# Altium PCB BOARD_4LAYER.PcbDoc (part 7 of 21)
Units mil, origin at the board's own origin, x right, y up, seen from the top; angles counter-clockwise.
Board outline 6692.91 x 10039.37 mil, 4 copper layers (Top Layer, Mid Layer 1, Mid Layer 2, Bottom Layer), stack 66.299 mil thick; 1532 components, 908 nets, 4105 pads, 1286 vias.
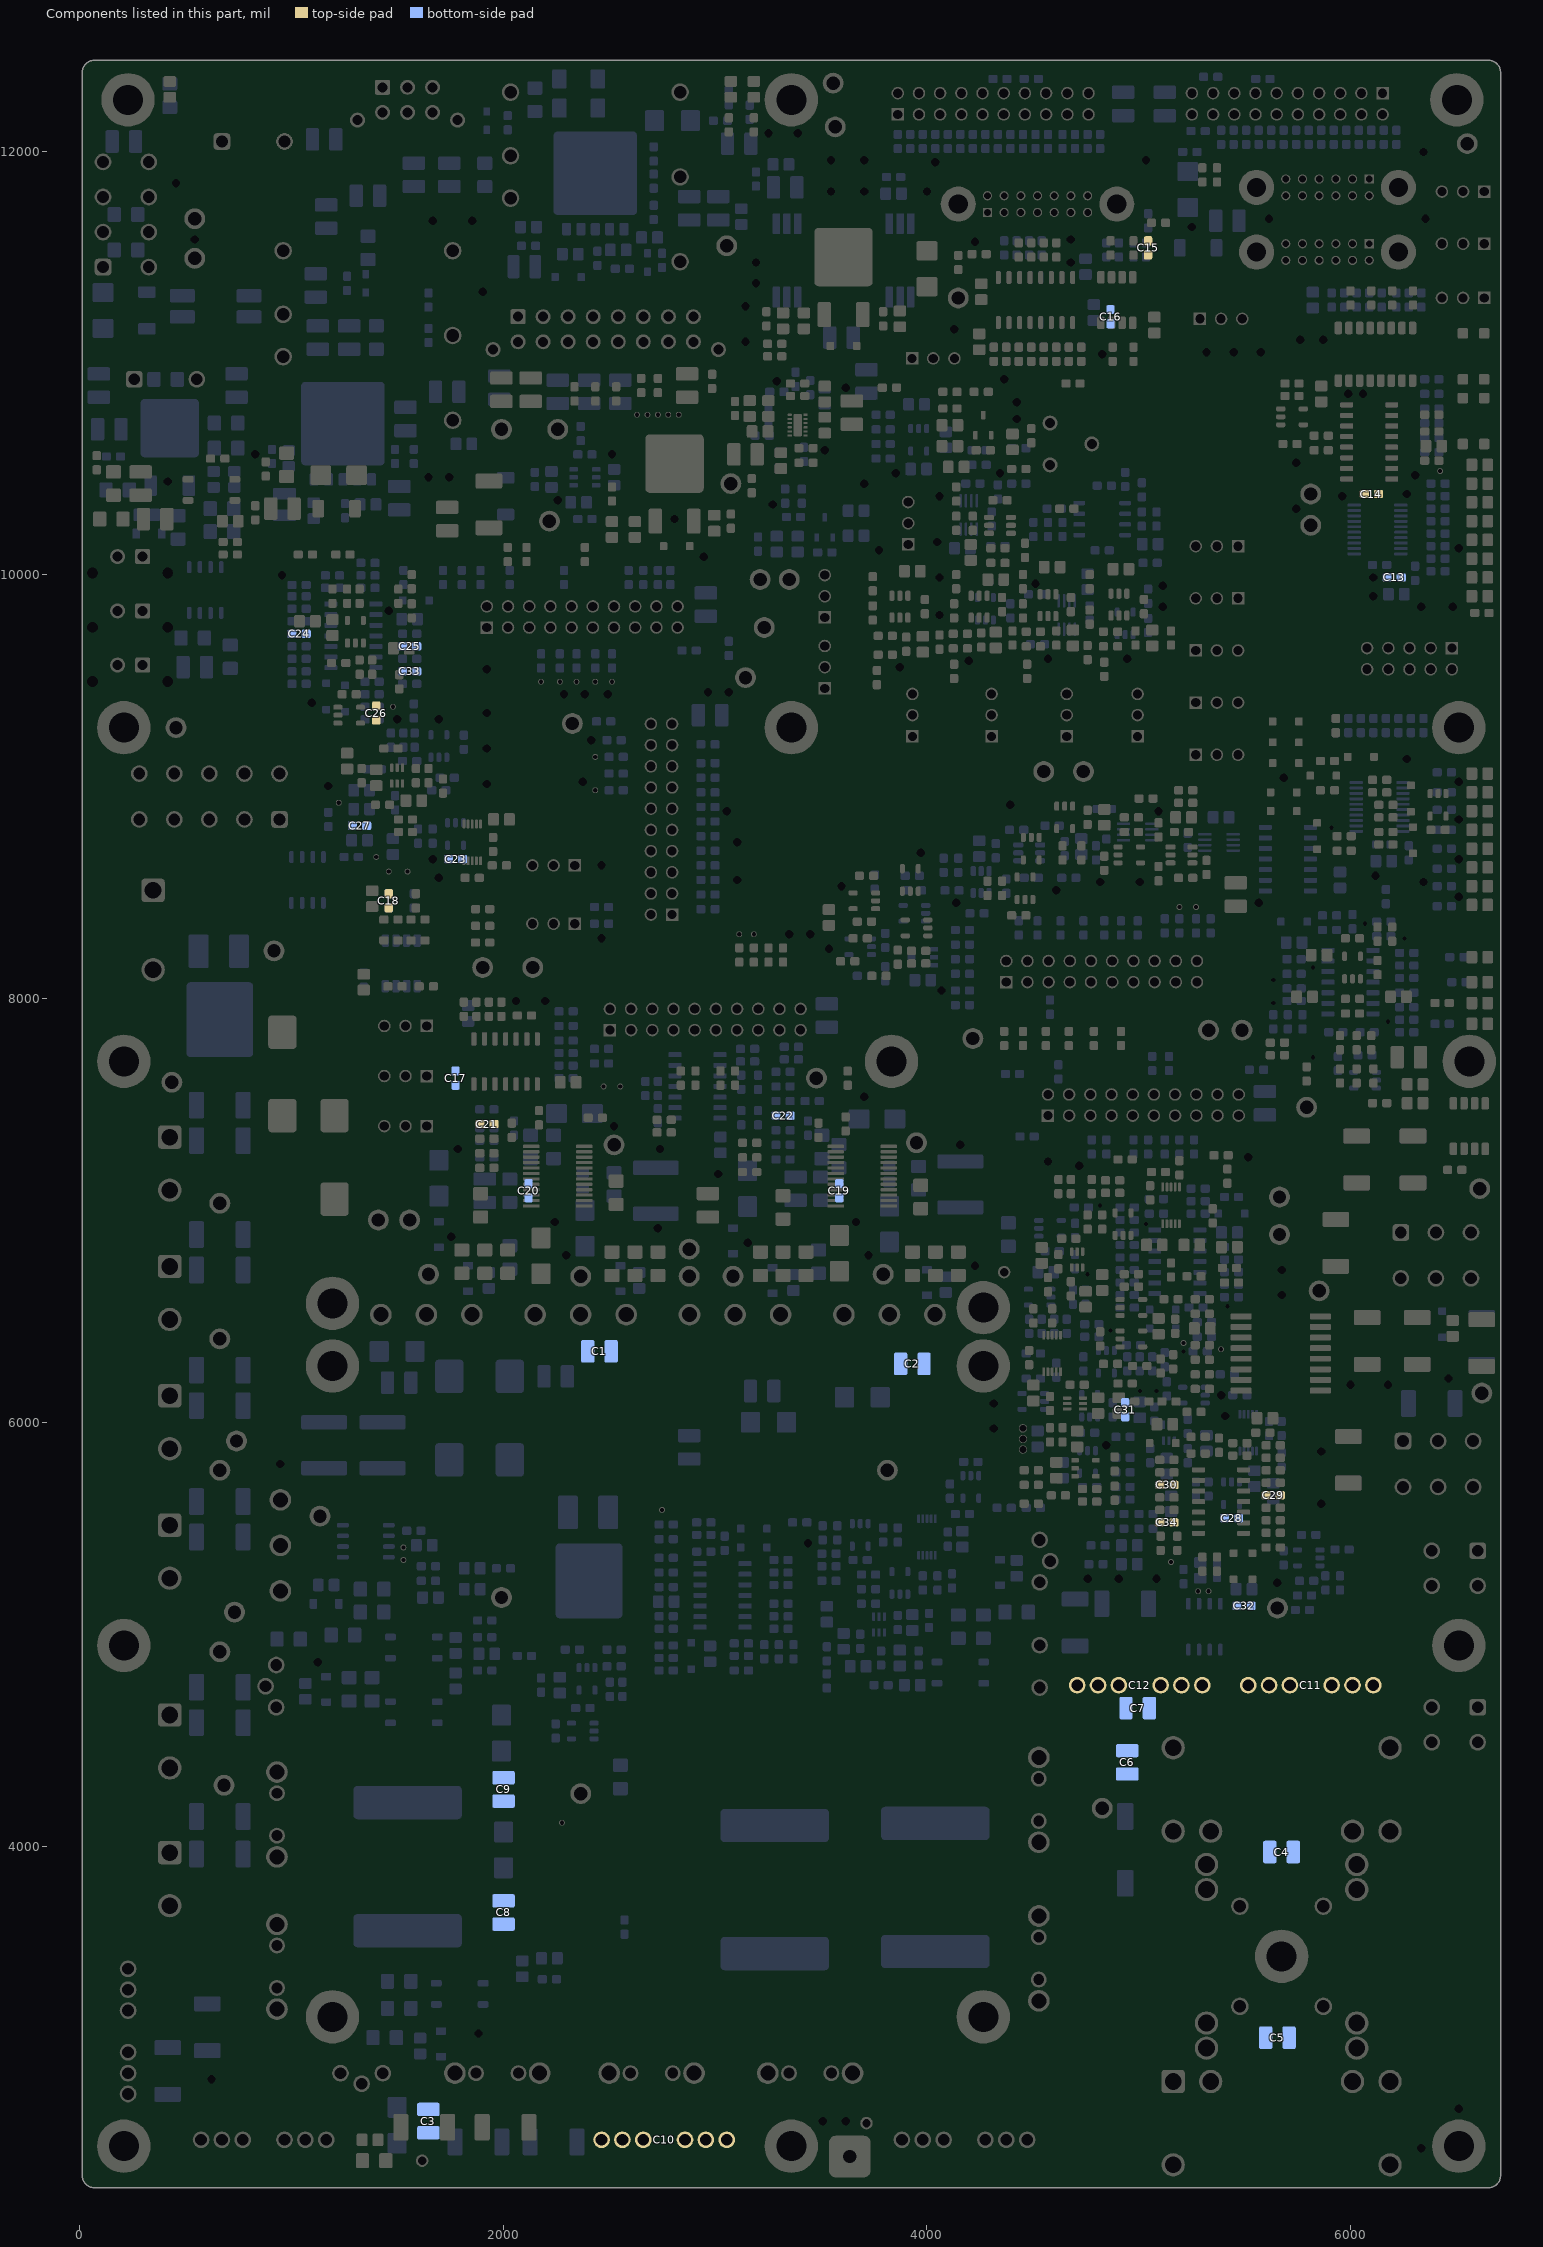
[diagram p9: the components of this part, seen from the top]

## Design rules (kind name [scope] priority, off if disabled: settings) (continued)
PolygonConnect PolygonConnect_In_GND_L01_P431 [IsNamedPolygon('GND_L01_P431')] p582: thpad.connectstyle=Relief thpad.reliefconductorwidth=19.68 thpad.reliefentries=4 thpad.polygonreliefangle="90 Angle" thpad.airgapwidth=9.84 smdpad.connectstyle=Relief smdpad.reliefconductorwidth=19.68 smdpad.reliefentries=4 smdpad.polygonreliefangle="90 Angle" smdpad.airgapwidth=9.84 via.connectstyle=Direct via.reliefconductorwidth=5.12 via.reliefentries=2 via.polygonreliefangle="90 Angle" via.airgapwidth=0
PolygonConnect PolygonConnect_In_GND_L01_P423 [IsNamedPolygon('GND_L01_P423')] p583: thpad.connectstyle=Relief thpad.reliefconductorwidth=19.68 thpad.reliefentries=4 thpad.polygonreliefangle="90 Angle" thpad.airgapwidth=9.84 smdpad.connectstyle=Relief smdpad.reliefconductorwidth=19.68 smdpad.reliefentries=4 smdpad.polygonreliefangle="90 Angle" smdpad.airgapwidth=9.84 via.connectstyle=Direct via.reliefconductorwidth=5.12 via.reliefentries=2 via.polygonreliefangle="90 Angle" via.airgapwidth=0
PolygonConnect PolygonConnect_In_U_TS_L-01_P155 [IsNamedPolygon('U_TS_L-01_P155')] p584: thpad.connectstyle=Relief thpad.reliefconductorwidth=19.68 thpad.reliefentries=4 thpad.polygonreliefangle="90 Angle" thpad.airgapwidth=9.84 smdpad.connectstyle=Relief smdpad.reliefconductorwidth=19.68 smdpad.reliefentries=4 smdpad.polygonreliefangle="90 Angle" smdpad.airgapwidth=9.84 via.connectstyle=Direct via.reliefconductorwidth=5.12 via.reliefentries=2 via.polygonreliefangle="90 Angle" via.airgapwidth=0
PolygonConnect PolygonConnect_In_+U_VENT_L02_P503 [IsNamedPolygon('+U_VENT_L02_P503')] p585: thpad.connectstyle=Relief thpad.reliefconductorwidth=19.68 thpad.reliefentries=4 thpad.polygonreliefangle="90 Angle" thpad.airgapwidth=9.84 smdpad.connectstyle=Relief smdpad.reliefconductorwidth=19.68 smdpad.reliefentries=4 smdpad.polygonreliefangle="90 Angle" smdpad.airgapwidth=9.84 via.connectstyle=Direct via.reliefconductorwidth=5.12 via.reliefentries=2 via.polygonreliefangle="90 Angle" via.airgapwidth=0
PolygonConnect PolygonConnect_In_$6N135_L-01_P085 [IsNamedPolygon('$6N135_L-01_P085')] p586: thpad.connectstyle=Relief thpad.reliefconductorwidth=19.68 thpad.reliefentries=4 thpad.polygonreliefangle="90 Angle" thpad.airgapwidth=9.84 smdpad.connectstyle=Relief smdpad.reliefconductorwidth=19.68 smdpad.reliefentries=4 smdpad.polygonreliefangle="90 Angle" smdpad.airgapwidth=9.84 via.connectstyle=Direct via.reliefconductorwidth=5.12 via.reliefentries=2 via.polygonreliefangle="90 Angle" via.airgapwidth=0
PolygonConnect PolygonConnect_In_GND_UM_L02_P619 [IsNamedPolygon('GND_UM_L02_P619')] p587: thpad.connectstyle=Relief thpad.reliefconductorwidth=19.68 thpad.reliefentries=4 thpad.polygonreliefangle="90 Angle" thpad.airgapwidth=9.84 smdpad.connectstyle=Relief smdpad.reliefconductorwidth=19.68 smdpad.reliefentries=4 smdpad.polygonreliefangle="90 Angle" smdpad.airgapwidth=9.84 via.connectstyle=Direct via.reliefconductorwidth=5.12 via.reliefentries=2 via.polygonreliefangle="90 Angle" via.airgapwidth=0
PolygonConnect PolygonConnect_In_$4N4016_L02_P538 [IsNamedPolygon('$4N4016_L02_P538')] p588: thpad.connectstyle=Relief thpad.reliefconductorwidth=19.68 thpad.reliefentries=4 thpad.polygonreliefangle="90 Angle" thpad.airgapwidth=9.84 smdpad.connectstyle=Relief smdpad.reliefconductorwidth=19.68 smdpad.reliefentries=4 smdpad.polygonreliefangle="90 Angle" smdpad.airgapwidth=9.84 via.connectstyle=Direct via.reliefconductorwidth=5.12 via.reliefentries=2 via.polygonreliefangle="90 Angle" via.airgapwidth=0
PolygonConnect PolygonConnect_In_$2N2408_L-01_P170 [IsNamedPolygon('$2N2408_L-01_P170')] p589: thpad.connectstyle=Relief thpad.reliefconductorwidth=19.68 thpad.reliefentries=4 thpad.polygonreliefangle="90 Angle" thpad.airgapwidth=9.84 smdpad.connectstyle=Relief smdpad.reliefconductorwidth=19.68 smdpad.reliefentries=4 smdpad.polygonreliefangle="90 Angle" smdpad.airgapwidth=9.84 via.connectstyle=Direct via.reliefconductorwidth=5.12 via.reliefentries=2 via.polygonreliefangle="90 Angle" via.airgapwidth=0
PolygonConnect PolygonConnect_In_GND_L02_P409 [IsNamedPolygon('GND_L02_P409')] p590: thpad.connectstyle=Relief thpad.reliefconductorwidth=19.68 thpad.reliefentries=4 thpad.polygonreliefangle="90 Angle" thpad.airgapwidth=9.84 smdpad.connectstyle=Relief smdpad.reliefconductorwidth=19.68 smdpad.reliefentries=4 smdpad.polygonreliefangle="90 Angle" smdpad.airgapwidth=9.84 via.connectstyle=Direct via.reliefconductorwidth=5.12 via.reliefentries=2 via.polygonreliefangle="90 Angle" via.airgapwidth=0
PolygonConnect PolygonConnect_In_PGND_L02_P238 [IsNamedPolygon('PGND_L02_P238')] p591: thpad.connectstyle=Relief thpad.reliefconductorwidth=19.68 thpad.reliefentries=4 thpad.polygonreliefangle="90 Angle" thpad.airgapwidth=9.84 smdpad.connectstyle=Relief smdpad.reliefconductorwidth=19.68 smdpad.reliefentries=4 smdpad.polygonreliefangle="90 Angle" smdpad.airgapwidth=9.84 via.connectstyle=Direct via.reliefconductorwidth=5.12 via.reliefentries=2 via.polygonreliefangle="90 Angle" via.airgapwidth=0
PolygonConnect PolygonConnect_In_$6N134_L-01_P111 [IsNamedPolygon('$6N134_L-01_P111')] p592: thpad.connectstyle=Relief thpad.reliefconductorwidth=19.68 thpad.reliefentries=4 thpad.polygonreliefangle="90 Angle" thpad.airgapwidth=9.84 smdpad.connectstyle=Relief smdpad.reliefconductorwidth=19.68 smdpad.reliefentries=4 smdpad.polygonreliefangle="90 Angle" smdpad.airgapwidth=9.84 via.connectstyle=Direct via.reliefconductorwidth=5.12 via.reliefentries=2 via.polygonreliefangle="90 Angle" via.airgapwidth=0
PolygonConnect PolygonConnect_In_$6N3315_L02_P050 [IsNamedPolygon('$6N3315_L02_P050')] p593: thpad.connectstyle=Relief thpad.reliefconductorwidth=19.68 thpad.reliefentries=4 thpad.polygonreliefangle="90 Angle" thpad.airgapwidth=9.84 smdpad.connectstyle=Relief smdpad.reliefconductorwidth=19.68 smdpad.reliefentries=4 smdpad.polygonreliefangle="90 Angle" smdpad.airgapwidth=9.84 via.connectstyle=Direct via.reliefconductorwidth=5.12 via.reliefentries=2 via.polygonreliefangle="90 Angle" via.airgapwidth=0
PolygonConnect PolygonConnect_In_$2N3778_L-01_P387 [IsNamedPolygon('$2N3778_L-01_P387')] p594: thpad.connectstyle=Relief thpad.reliefconductorwidth=19.68 thpad.reliefentries=4 thpad.polygonreliefangle="90 Angle" thpad.airgapwidth=9.84 smdpad.connectstyle=Relief smdpad.reliefconductorwidth=19.68 smdpad.reliefentries=4 smdpad.polygonreliefangle="90 Angle" smdpad.airgapwidth=9.84 via.connectstyle=Direct via.reliefconductorwidth=5.12 via.reliefentries=2 via.polygonreliefangle="90 Angle" via.airgapwidth=0
PolygonConnect PolygonConnect_In_$6N3156_L-01_P076 [IsNamedPolygon('$6N3156_L-01_P076')] p595: thpad.connectstyle=Relief thpad.reliefconductorwidth=19.68 thpad.reliefentries=4 thpad.polygonreliefangle="90 Angle" thpad.airgapwidth=9.84 smdpad.connectstyle=Relief smdpad.reliefconductorwidth=19.68 smdpad.reliefentries=4 smdpad.polygonreliefangle="90 Angle" smdpad.airgapwidth=9.84 via.connectstyle=Direct via.reliefconductorwidth=5.12 via.reliefentries=2 via.polygonreliefangle="90 Angle" via.airgapwidth=0
PolygonConnect PolygonConnect_In_UL_L-01_P381 [IsNamedPolygon('UL_L-01_P381')] p596: thpad.connectstyle=Relief thpad.reliefconductorwidth=19.68 thpad.reliefentries=4 thpad.polygonreliefangle="90 Angle" thpad.airgapwidth=9.84 smdpad.connectstyle=Relief smdpad.reliefconductorwidth=19.68 smdpad.reliefentries=4 smdpad.polygonreliefangle="90 Angle" smdpad.airgapwidth=9.84 via.connectstyle=Direct via.reliefconductorwidth=5.12 via.reliefentries=2 via.polygonreliefangle="90 Angle" via.airgapwidth=0
PolygonConnect PolygonConnect_In_PGND_L-01_P235 [IsNamedPolygon('PGND_L-01_P235')] p597: thpad.connectstyle=Relief thpad.reliefconductorwidth=19.68 thpad.reliefentries=4 thpad.polygonreliefangle="90 Angle" thpad.airgapwidth=9.84 smdpad.connectstyle=Relief smdpad.reliefconductorwidth=19.68 smdpad.reliefentries=4 smdpad.polygonreliefangle="90 Angle" smdpad.airgapwidth=9.84 via.connectstyle=Direct via.reliefconductorwidth=5.12 via.reliefentries=2 via.polygonreliefangle="90 Angle" via.airgapwidth=0
PolygonConnect PolygonConnect_In_$6N106_L01_P055 [IsNamedPolygon('$6N106_L01_P055')] p598: thpad.connectstyle=Relief thpad.reliefconductorwidth=19.68 thpad.reliefentries=4 thpad.polygonreliefangle="90 Angle" thpad.airgapwidth=9.84 smdpad.connectstyle=Relief smdpad.reliefconductorwidth=19.68 smdpad.reliefentries=4 smdpad.polygonreliefangle="90 Angle" smdpad.airgapwidth=9.84 via.connectstyle=Direct via.reliefconductorwidth=5.12 via.reliefentries=2 via.polygonreliefangle="90 Angle" via.airgapwidth=0
PolygonConnect PolygonConnect_In_$2N5063_L01_P639 [IsNamedPolygon('$2N5063_L01_P639')] p599: thpad.connectstyle=Relief thpad.reliefconductorwidth=19.68 thpad.reliefentries=4 thpad.polygonreliefangle="90 Angle" thpad.airgapwidth=9.84 smdpad.connectstyle=Relief smdpad.reliefconductorwidth=19.68 smdpad.reliefentries=4 smdpad.polygonreliefangle="90 Angle" smdpad.airgapwidth=9.84 via.connectstyle=Direct via.reliefconductorwidth=5.12 via.reliefentries=2 via.polygonreliefangle="90 Angle" via.airgapwidth=0
PolygonConnect PolygonConnect_In_GND_UM_L-01_P637 [IsNamedPolygon('GND_UM_L-01_P637')] p600: thpad.connectstyle=Relief thpad.reliefconductorwidth=19.68 thpad.reliefentries=4 thpad.polygonreliefangle="90 Angle" thpad.airgapwidth=9.84 smdpad.connectstyle=Relief smdpad.reliefconductorwidth=19.68 smdpad.reliefentries=4 smdpad.polygonreliefangle="90 Angle" smdpad.airgapwidth=9.84 via.connectstyle=Direct via.reliefconductorwidth=5.12 via.reliefentries=2 via.polygonreliefangle="90 Angle" via.airgapwidth=0
PolygonConnect PolygonConnect_In_$6N94_L-01_P037 [IsNamedPolygon('$6N94_L-01_P037')] p601: thpad.connectstyle=Relief thpad.reliefconductorwidth=19.68 thpad.reliefentries=4 thpad.polygonreliefangle="90 Angle" thpad.airgapwidth=9.84 smdpad.connectstyle=Relief smdpad.reliefconductorwidth=19.68 smdpad.reliefentries=4 smdpad.polygonreliefangle="90 Angle" smdpad.airgapwidth=9.84 via.connectstyle=Direct via.reliefconductorwidth=5.12 via.reliefentries=2 via.polygonreliefangle="90 Angle" via.airgapwidth=0
PolygonConnect PolygonConnect_In_GND_UM_L01_P608 [IsNamedPolygon('GND_UM_L01_P608')] p602: thpad.connectstyle=Relief thpad.reliefconductorwidth=19.68 thpad.reliefentries=4 thpad.polygonreliefangle="90 Angle" thpad.airgapwidth=9.84 smdpad.connectstyle=Relief smdpad.reliefconductorwidth=19.68 smdpad.reliefentries=4 smdpad.polygonreliefangle="90 Angle" smdpad.airgapwidth=9.84 via.connectstyle=Direct via.reliefconductorwidth=5.12 via.reliefentries=2 via.polygonreliefangle="90 Angle" via.airgapwidth=0
PolygonConnect PolygonConnect_In_GND_L01_P416 [IsNamedPolygon('GND_L01_P416')] p603: thpad.connectstyle=Relief thpad.reliefconductorwidth=19.68 thpad.reliefentries=4 thpad.polygonreliefangle="90 Angle" thpad.airgapwidth=9.84 smdpad.connectstyle=Relief smdpad.reliefconductorwidth=19.68 smdpad.reliefentries=4 smdpad.polygonreliefangle="90 Angle" smdpad.airgapwidth=9.84 via.connectstyle=Direct via.reliefconductorwidth=5.12 via.reliefentries=2 via.polygonreliefangle="90 Angle" via.airgapwidth=0
PolygonConnect PolygonConnect_In_PGND_L01_P223 [IsNamedPolygon('PGND_L01_P223')] p604: thpad.connectstyle=Relief thpad.reliefconductorwidth=19.68 thpad.reliefentries=4 thpad.polygonreliefangle="90 Angle" thpad.airgapwidth=9.84 smdpad.connectstyle=Relief smdpad.reliefconductorwidth=19.68 smdpad.reliefentries=4 smdpad.polygonreliefangle="90 Angle" smdpad.airgapwidth=9.84 via.connectstyle=Direct via.reliefconductorwidth=5.12 via.reliefentries=2 via.polygonreliefangle="90 Angle" via.airgapwidth=0
PolygonConnect PolygonConnect_In_PGND_L02_P244 [IsNamedPolygon('PGND_L02_P244')] p605: thpad.connectstyle=Relief thpad.reliefconductorwidth=19.68 thpad.reliefentries=4 thpad.polygonreliefangle="90 Angle" thpad.airgapwidth=9.84 smdpad.connectstyle=Relief smdpad.reliefconductorwidth=19.68 smdpad.reliefentries=4 smdpad.polygonreliefangle="90 Angle" smdpad.airgapwidth=9.84 via.connectstyle=Direct via.reliefconductorwidth=5.12 via.reliefentries=2 via.polygonreliefangle="90 Angle" via.airgapwidth=0
PolygonConnect PolygonConnect_In_$4N4016_L-01_P548 [IsNamedPolygon('$4N4016_L-01_P548')] p606: thpad.connectstyle=Relief thpad.reliefconductorwidth=19.68 thpad.reliefentries=4 thpad.polygonreliefangle="90 Angle" thpad.airgapwidth=9.84 smdpad.connectstyle=Relief smdpad.reliefconductorwidth=19.68 smdpad.reliefentries=4 smdpad.polygonreliefangle="90 Angle" smdpad.airgapwidth=9.84 via.connectstyle=Direct via.reliefconductorwidth=5.12 via.reliefentries=2 via.polygonreliefangle="90 Angle" via.airgapwidth=0
PolygonConnect PolygonConnect_In_PGND_L-01_P280 [IsNamedPolygon('PGND_L-01_P280')] p607: thpad.connectstyle=Relief thpad.reliefconductorwidth=19.68 thpad.reliefentries=4 thpad.polygonreliefangle="90 Angle" thpad.airgapwidth=9.84 smdpad.connectstyle=Relief smdpad.reliefconductorwidth=19.68 smdpad.reliefentries=4 smdpad.polygonreliefangle="90 Angle" smdpad.airgapwidth=9.84 via.connectstyle=Direct via.reliefconductorwidth=5.12 via.reliefentries=2 via.polygonreliefangle="90 Angle" via.airgapwidth=0
PolygonConnect PolygonConnect_In_~U_TP_L02_P358 [IsNamedPolygon('~U_TP_L02_P358')] p608: thpad.connectstyle=Relief thpad.reliefconductorwidth=19.68 thpad.reliefentries=4 thpad.polygonreliefangle="90 Angle" thpad.airgapwidth=9.84 smdpad.connectstyle=Relief smdpad.reliefconductorwidth=19.68 smdpad.reliefentries=4 smdpad.polygonreliefangle="90 Angle" smdpad.airgapwidth=9.84 via.connectstyle=Direct via.reliefconductorwidth=5.12 via.reliefentries=2 via.polygonreliefangle="90 Angle" via.airgapwidth=0
PolygonConnect PolygonConnect_In_U_TP_L-01_P353 [IsNamedPolygon('U_TP_L-01_P353')] p609: thpad.connectstyle=Relief thpad.reliefconductorwidth=19.68 thpad.reliefentries=4 thpad.polygonreliefangle="90 Angle" thpad.airgapwidth=9.84 smdpad.connectstyle=Relief smdpad.reliefconductorwidth=19.68 smdpad.reliefentries=4 smdpad.polygonreliefangle="90 Angle" smdpad.airgapwidth=9.84 via.connectstyle=Direct via.reliefconductorwidth=5.12 via.reliefentries=2 via.polygonreliefangle="90 Angle" via.airgapwidth=0
PolygonConnect PolygonConnect_In_PGND_L02_P312 [IsNamedPolygon('PGND_L02_P312')] p610: thpad.connectstyle=Relief thpad.reliefconductorwidth=19.68 thpad.reliefentries=4 thpad.polygonreliefangle="90 Angle" thpad.airgapwidth=9.84 smdpad.connectstyle=Relief smdpad.reliefconductorwidth=19.68 smdpad.reliefentries=4 smdpad.polygonreliefangle="90 Angle" smdpad.airgapwidth=9.84 via.connectstyle=Direct via.reliefconductorwidth=5.12 via.reliefentries=2 via.polygonreliefangle="90 Angle" via.airgapwidth=0
PolygonConnect PolygonConnect_In_~U_TS_L01_P133 [IsNamedPolygon('~U_TS_L01_P133')] p611: thpad.connectstyle=Relief thpad.reliefconductorwidth=19.68 thpad.reliefentries=4 thpad.polygonreliefangle="90 Angle" thpad.airgapwidth=9.84 smdpad.connectstyle=Relief smdpad.reliefconductorwidth=19.68 smdpad.reliefentries=4 smdpad.polygonreliefangle="90 Angle" smdpad.airgapwidth=9.84 via.connectstyle=Direct via.reliefconductorwidth=5.12 via.reliefentries=2 via.polygonreliefangle="90 Angle" via.airgapwidth=0
PolygonConnect PolygonConnect_In_UH_L-01_P324 [IsNamedPolygon('UH_L-01_P324')] p612: thpad.connectstyle=Relief thpad.reliefconductorwidth=19.68 thpad.reliefentries=4 thpad.polygonreliefangle="90 Angle" thpad.airgapwidth=9.84 smdpad.connectstyle=Relief smdpad.reliefconductorwidth=19.68 smdpad.reliefentries=4 smdpad.polygonreliefangle="90 Angle" smdpad.airgapwidth=9.84 via.connectstyle=Direct via.reliefconductorwidth=5.12 via.reliefentries=2 via.polygonreliefangle="90 Angle" via.airgapwidth=0
PolygonConnect PolygonConnect_In_$6N135_L02_P092 [IsNamedPolygon('$6N135_L02_P092')] p613: thpad.connectstyle=Relief thpad.reliefconductorwidth=19.68 thpad.reliefentries=4 thpad.polygonreliefangle="90 Angle" thpad.airgapwidth=9.84 smdpad.connectstyle=Relief smdpad.reliefconductorwidth=19.68 smdpad.reliefentries=4 smdpad.polygonreliefangle="90 Angle" smdpad.airgapwidth=9.84 via.connectstyle=Direct via.reliefconductorwidth=5.12 via.reliefentries=2 via.polygonreliefangle="90 Angle" via.airgapwidth=0
PolygonConnect PolygonConnect_In_UL_L02_P366 [IsNamedPolygon('UL_L02_P366')] p614: thpad.connectstyle=Relief thpad.reliefconductorwidth=19.68 thpad.reliefentries=4 thpad.polygonreliefangle="90 Angle" thpad.airgapwidth=9.84 smdpad.connectstyle=Relief smdpad.reliefconductorwidth=19.68 smdpad.reliefentries=4 smdpad.polygonreliefangle="90 Angle" smdpad.airgapwidth=9.84 via.connectstyle=Direct via.reliefconductorwidth=5.12 via.reliefentries=2 via.polygonreliefangle="90 Angle" via.airgapwidth=0
PolygonConnect PolygonConnect_In_GND_L01_P457 [IsNamedPolygon('GND_L01_P457')] p615: thpad.connectstyle=Relief thpad.reliefconductorwidth=19.68 thpad.reliefentries=4 thpad.polygonreliefangle="90 Angle" thpad.airgapwidth=9.84 smdpad.connectstyle=Relief smdpad.reliefconductorwidth=19.68 smdpad.reliefentries=4 smdpad.polygonreliefangle="90 Angle" smdpad.airgapwidth=9.84 via.connectstyle=Direct via.reliefconductorwidth=5.12 via.reliefentries=2 via.polygonreliefangle="90 Angle" via.airgapwidth=0
PolygonConnect PolygonConnect_In_UL_L-01_P365 [IsNamedPolygon('UL_L-01_P365')] p616: thpad.connectstyle=Relief thpad.reliefconductorwidth=19.68 thpad.reliefentries=4 thpad.polygonreliefangle="90 Angle" thpad.airgapwidth=9.84 smdpad.connectstyle=Relief smdpad.reliefconductorwidth=19.68 smdpad.reliefentries=4 smdpad.polygonreliefangle="90 Angle" smdpad.airgapwidth=9.84 via.connectstyle=Direct via.reliefconductorwidth=5.12 via.reliefentries=2 via.polygonreliefangle="90 Angle" via.airgapwidth=0
PolygonConnect PolygonConnect_In_I_MOST_L-01_P334 [IsNamedPolygon('I_MOST_L-01_P334')] p617: thpad.connectstyle=Relief thpad.reliefconductorwidth=19.68 thpad.reliefentries=4 thpad.polygonreliefangle="90 Angle" thpad.airgapwidth=9.84 smdpad.connectstyle=Relief smdpad.reliefconductorwidth=19.68 smdpad.reliefentries=4 smdpad.polygonreliefangle="90 Angle" smdpad.airgapwidth=9.84 via.connectstyle=Direct via.reliefconductorwidth=5.12 via.reliefentries=2 via.polygonreliefangle="90 Angle" via.airgapwidth=0
PolygonConnect PolygonConnect_In_GND_UM_L01_P632 [IsNamedPolygon('GND_UM_L01_P632')] p618: thpad.connectstyle=Relief thpad.reliefconductorwidth=19.68 thpad.reliefentries=4 thpad.polygonreliefangle="90 Angle" thpad.airgapwidth=9.84 smdpad.connectstyle=Relief smdpad.reliefconductorwidth=19.68 smdpad.reliefentries=4 smdpad.polygonreliefangle="90 Angle" smdpad.airgapwidth=9.84 via.connectstyle=Direct via.reliefconductorwidth=5.12 via.reliefentries=2 via.polygonreliefangle="90 Angle" via.airgapwidth=0
PolygonConnect PolygonConnect_In_UL_L02_P377 [IsNamedPolygon('UL_L02_P377')] p619: thpad.connectstyle=Relief thpad.reliefconductorwidth=19.68 thpad.reliefentries=4 thpad.polygonreliefangle="90 Angle" thpad.airgapwidth=9.84 smdpad.connectstyle=Relief smdpad.reliefconductorwidth=19.68 smdpad.reliefentries=4 smdpad.polygonreliefangle="90 Angle" smdpad.airgapwidth=9.84 via.connectstyle=Direct via.reliefconductorwidth=5.12 via.reliefentries=2 via.polygonreliefangle="90 Angle" via.airgapwidth=0
PolygonConnect PolygonConnect_In_$6N3156_L-01_P080 [IsNamedPolygon('$6N3156_L-01_P080')] p620: thpad.connectstyle=Relief thpad.reliefconductorwidth=19.68 thpad.reliefentries=4 thpad.polygonreliefangle="90 Angle" thpad.airgapwidth=9.84 smdpad.connectstyle=Relief smdpad.reliefconductorwidth=19.68 smdpad.reliefentries=4 smdpad.polygonreliefangle="90 Angle" smdpad.airgapwidth=9.84 via.connectstyle=Direct via.reliefconductorwidth=5.12 via.reliefentries=2 via.polygonreliefangle="90 Angle" via.airgapwidth=0
PolygonConnect PolygonConnect_In_PGND_L01_P189 [IsNamedPolygon('PGND_L01_P189')] p621: thpad.connectstyle=Relief thpad.reliefconductorwidth=19.68 thpad.reliefentries=4 thpad.polygonreliefangle="90 Angle" thpad.airgapwidth=9.84 smdpad.connectstyle=Relief smdpad.reliefconductorwidth=19.68 smdpad.reliefentries=4 smdpad.polygonreliefangle="90 Angle" smdpad.airgapwidth=9.84 via.connectstyle=Direct via.reliefconductorwidth=5.12 via.reliefentries=2 via.polygonreliefangle="90 Angle" via.airgapwidth=0
PolygonConnect PolygonConnect_In_U_TS_L-01_P152 [IsNamedPolygon('U_TS_L-01_P152')] p622: thpad.connectstyle=Relief thpad.reliefconductorwidth=19.68 thpad.reliefentries=4 thpad.polygonreliefangle="90 Angle" thpad.airgapwidth=9.84 smdpad.connectstyle=Relief smdpad.reliefconductorwidth=19.68 smdpad.reliefentries=4 smdpad.polygonreliefangle="90 Angle" smdpad.airgapwidth=9.84 via.connectstyle=Direct via.reliefconductorwidth=5.12 via.reliefentries=2 via.polygonreliefangle="90 Angle" via.airgapwidth=0
PolygonConnect PolygonConnect_In_$4N4014_L01_P568 [IsNamedPolygon('$4N4014_L01_P568')] p623: thpad.connectstyle=Relief thpad.reliefconductorwidth=19.68 thpad.reliefentries=4 thpad.polygonreliefangle="90 Angle" thpad.airgapwidth=9.84 smdpad.connectstyle=Relief smdpad.reliefconductorwidth=19.68 smdpad.reliefentries=4 smdpad.polygonreliefangle="90 Angle" smdpad.airgapwidth=9.84 via.connectstyle=Direct via.reliefconductorwidth=5.12 via.reliefentries=2 via.polygonreliefangle="90 Angle" via.airgapwidth=0
PolygonConnect PolygonConnect_In_GND_L02_P394 [IsNamedPolygon('GND_L02_P394')] p624: thpad.connectstyle=Relief thpad.reliefconductorwidth=19.68 thpad.reliefentries=4 thpad.polygonreliefangle="90 Angle" thpad.airgapwidth=9.84 smdpad.connectstyle=Relief smdpad.reliefconductorwidth=19.68 smdpad.reliefentries=4 smdpad.polygonreliefangle="90 Angle" smdpad.airgapwidth=9.84 via.connectstyle=Direct via.reliefconductorwidth=5.12 via.reliefentries=2 via.polygonreliefangle="90 Angle" via.airgapwidth=0
PolygonConnect PolygonConnect_In_-U_AMP_L-01_P012 [IsNamedPolygon('-U_AMP_L-01_P012')] p625: thpad.connectstyle=Relief thpad.reliefconductorwidth=19.68 thpad.reliefentries=4 thpad.polygonreliefangle="90 Angle" thpad.airgapwidth=9.84 smdpad.connectstyle=Relief smdpad.reliefconductorwidth=19.68 smdpad.reliefentries=4 smdpad.polygonreliefangle="90 Angle" smdpad.airgapwidth=9.84 via.connectstyle=Direct via.reliefconductorwidth=5.12 via.reliefentries=2 via.polygonreliefangle="90 Angle" via.airgapwidth=0
PolygonConnect PolygonConnect_In_GND_L01_P453 [IsNamedPolygon('GND_L01_P453')] p626: thpad.connectstyle=Relief thpad.reliefconductorwidth=19.68 thpad.reliefentries=4 thpad.polygonreliefangle="90 Angle" thpad.airgapwidth=9.84 smdpad.connectstyle=Relief smdpad.reliefconductorwidth=19.68 smdpad.reliefentries=4 smdpad.polygonreliefangle="90 Angle" smdpad.airgapwidth=9.84 via.connectstyle=Direct via.reliefconductorwidth=5.12 via.reliefentries=2 via.polygonreliefangle="90 Angle" via.airgapwidth=0
PolygonConnect PolygonConnect_In_$2N2408_L01_P174 [IsNamedPolygon('$2N2408_L01_P174')] p627: thpad.connectstyle=Relief thpad.reliefconductorwidth=19.68 thpad.reliefentries=4 thpad.polygonreliefangle="90 Angle" thpad.airgapwidth=9.84 smdpad.connectstyle=Relief smdpad.reliefconductorwidth=19.68 smdpad.reliefentries=4 smdpad.polygonreliefangle="90 Angle" smdpad.airgapwidth=9.84 via.connectstyle=Direct via.reliefconductorwidth=5.12 via.reliefentries=2 via.polygonreliefangle="90 Angle" via.airgapwidth=0
PolygonConnect PolygonConnect_In_GND_UM_L01_P602 [IsNamedPolygon('GND_UM_L01_P602')] p628: thpad.connectstyle=Relief thpad.reliefconductorwidth=19.68 thpad.reliefentries=4 thpad.polygonreliefangle="90 Angle" thpad.airgapwidth=9.84 smdpad.connectstyle=Relief smdpad.reliefconductorwidth=19.68 smdpad.reliefentries=4 smdpad.polygonreliefangle="90 Angle" smdpad.airgapwidth=9.84 via.connectstyle=Direct via.reliefconductorwidth=5.12 via.reliefentries=2 via.polygonreliefangle="90 Angle" via.airgapwidth=0
PolygonConnect PolygonConnect_In_PGND_L-01_P314 [IsNamedPolygon('PGND_L-01_P314')] p629: thpad.connectstyle=Relief thpad.reliefconductorwidth=19.68 thpad.reliefentries=4 thpad.polygonreliefangle="90 Angle" thpad.airgapwidth=9.84 smdpad.connectstyle=Relief smdpad.reliefconductorwidth=19.68 smdpad.reliefentries=4 smdpad.polygonreliefangle="90 Angle" smdpad.airgapwidth=9.84 via.connectstyle=Direct via.reliefconductorwidth=5.12 via.reliefentries=2 via.polygonreliefangle="90 Angle" via.airgapwidth=0
PolygonConnect PolygonConnect_In_$4N2816_L-01_P499 [IsNamedPolygon('$4N2816_L-01_P499')] p630: thpad.connectstyle=Relief thpad.reliefconductorwidth=19.68 thpad.reliefentries=4 thpad.polygonreliefangle="90 Angle" thpad.airgapwidth=9.84 smdpad.connectstyle=Relief smdpad.reliefconductorwidth=19.68 smdpad.reliefentries=4 smdpad.polygonreliefangle="90 Angle" smdpad.airgapwidth=9.84 via.connectstyle=Direct via.reliefconductorwidth=5.12 via.reliefentries=2 via.polygonreliefangle="90 Angle" via.airgapwidth=0
PolygonConnect PolygonConnect_In_-U_AMP_L01_P005 [IsNamedPolygon('-U_AMP_L01_P005')] p631: thpad.connectstyle=Relief thpad.reliefconductorwidth=19.68 thpad.reliefentries=4 thpad.polygonreliefangle="90 Angle" thpad.airgapwidth=9.84 smdpad.connectstyle=Relief smdpad.reliefconductorwidth=19.68 smdpad.reliefentries=4 smdpad.polygonreliefangle="90 Angle" smdpad.airgapwidth=9.84 via.connectstyle=Direct via.reliefconductorwidth=5.12 via.reliefentries=2 via.polygonreliefangle="90 Angle" via.airgapwidth=0
PolygonConnect PolygonConnect_In_GND_UM_L01_P604 [IsNamedPolygon('GND_UM_L01_P604')] p632: thpad.connectstyle=Relief thpad.reliefconductorwidth=19.68 thpad.reliefentries=4 thpad.polygonreliefangle="90 Angle" thpad.airgapwidth=9.84 smdpad.connectstyle=Relief smdpad.reliefconductorwidth=19.68 smdpad.reliefentries=4 smdpad.polygonreliefangle="90 Angle" smdpad.airgapwidth=9.84 via.connectstyle=Direct via.reliefconductorwidth=5.12 via.reliefentries=2 via.polygonreliefangle="90 Angle" via.airgapwidth=0
PolygonConnect PolygonConnect_In_$2N2430_L-01_P347 [IsNamedPolygon('$2N2430_L-01_P347')] p633: thpad.connectstyle=Relief thpad.reliefconductorwidth=19.68 thpad.reliefentries=4 thpad.polygonreliefangle="90 Angle" thpad.airgapwidth=9.84 smdpad.connectstyle=Relief smdpad.reliefconductorwidth=19.68 smdpad.reliefentries=4 smdpad.polygonreliefangle="90 Angle" smdpad.airgapwidth=9.84 via.connectstyle=Direct via.reliefconductorwidth=5.12 via.reliefentries=2 via.polygonreliefangle="90 Angle" via.airgapwidth=0
PolygonConnect PolygonConnect_In_I_MOST_L-01_P338 [IsNamedPolygon('I_MOST_L-01_P338')] p634: thpad.connectstyle=Relief thpad.reliefconductorwidth=19.68 thpad.reliefentries=4 thpad.polygonreliefangle="90 Angle" thpad.airgapwidth=9.84 smdpad.connectstyle=Relief smdpad.reliefconductorwidth=19.68 smdpad.reliefentries=4 smdpad.polygonreliefangle="90 Angle" smdpad.airgapwidth=9.84 via.connectstyle=Direct via.reliefconductorwidth=5.12 via.reliefentries=2 via.polygonreliefangle="90 Angle" via.airgapwidth=0
PolygonConnect PolygonConnect_In_PGND_L01_P274 [IsNamedPolygon('PGND_L01_P274')] p635: thpad.connectstyle=Relief thpad.reliefconductorwidth=19.68 thpad.reliefentries=4 thpad.polygonreliefangle="90 Angle" thpad.airgapwidth=9.84 smdpad.connectstyle=Relief smdpad.reliefconductorwidth=19.68 smdpad.reliefentries=4 smdpad.polygonreliefangle="90 Angle" smdpad.airgapwidth=9.84 via.connectstyle=Direct via.reliefconductorwidth=5.12 via.reliefentries=2 via.polygonreliefangle="90 Angle" via.airgapwidth=0
PolygonConnect PolygonConnect_In_-U_VENT_L-01_P525 [IsNamedPolygon('-U_VENT_L-01_P525')] p636: thpad.connectstyle=Relief thpad.reliefconductorwidth=19.68 thpad.reliefentries=4 thpad.polygonreliefangle="90 Angle" thpad.airgapwidth=9.84 smdpad.connectstyle=Relief smdpad.reliefconductorwidth=19.68 smdpad.reliefentries=4 smdpad.polygonreliefangle="90 Angle" smdpad.airgapwidth=9.84 via.connectstyle=Direct via.reliefconductorwidth=5.12 via.reliefentries=2 via.polygonreliefangle="90 Angle" via.airgapwidth=0
PolygonConnect PolygonConnect_In_+U_VENT_L01_P509 [IsNamedPolygon('+U_VENT_L01_P509')] p637: thpad.connectstyle=Relief thpad.reliefconductorwidth=19.68 thpad.reliefentries=4 thpad.polygonreliefangle="90 Angle" thpad.airgapwidth=9.84 smdpad.connectstyle=Relief smdpad.reliefconductorwidth=19.68 smdpad.reliefentries=4 smdpad.polygonreliefangle="90 Angle" smdpad.airgapwidth=9.84 via.connectstyle=Direct via.reliefconductorwidth=5.12 via.reliefentries=2 via.polygonreliefangle="90 Angle" via.airgapwidth=0
PolygonConnect PolygonConnect_In_PGND_L01_P210 [IsNamedPolygon('PGND_L01_P210')] p638: thpad.connectstyle=Relief thpad.reliefconductorwidth=19.68 thpad.reliefentries=4 thpad.polygonreliefangle="90 Angle" thpad.airgapwidth=9.84 smdpad.connectstyle=Relief smdpad.reliefconductorwidth=19.68 smdpad.reliefentries=4 smdpad.polygonreliefangle="90 Angle" smdpad.airgapwidth=9.84 via.connectstyle=Direct via.reliefconductorwidth=5.12 via.reliefentries=2 via.polygonreliefangle="90 Angle" via.airgapwidth=0
PolygonConnect PolygonConnect_In_U_FIN_L-01_P146 [IsNamedPolygon('U_FIN_L-01_P146')] p639: thpad.connectstyle=Relief thpad.reliefconductorwidth=19.68 thpad.reliefentries=4 thpad.polygonreliefangle="90 Angle" thpad.airgapwidth=9.84 smdpad.connectstyle=Relief smdpad.reliefconductorwidth=19.68 smdpad.reliefentries=4 smdpad.polygonreliefangle="90 Angle" smdpad.airgapwidth=9.84 via.connectstyle=Direct via.reliefconductorwidth=5.12 via.reliefentries=2 via.polygonreliefangle="90 Angle" via.airgapwidth=0
PolygonConnect PolygonConnect_In_-U_AMP_L01_P008 [IsNamedPolygon('-U_AMP_L01_P008')] p640: thpad.connectstyle=Relief thpad.reliefconductorwidth=19.68 thpad.reliefentries=4 thpad.polygonreliefangle="90 Angle" thpad.airgapwidth=9.84 smdpad.connectstyle=Relief smdpad.reliefconductorwidth=19.68 smdpad.reliefentries=4 smdpad.polygonreliefangle="90 Angle" smdpad.airgapwidth=9.84 via.connectstyle=Direct via.reliefconductorwidth=5.12 via.reliefentries=2 via.polygonreliefangle="90 Angle" via.airgapwidth=0
PolygonConnect PolygonConnect_In_$6N3156_L-01_P082 [IsNamedPolygon('$6N3156_L-01_P082')] p641: thpad.connectstyle=Relief thpad.reliefconductorwidth=19.68 thpad.reliefentries=4 thpad.polygonreliefangle="90 Angle" thpad.airgapwidth=9.84 smdpad.connectstyle=Relief smdpad.reliefconductorwidth=19.68 smdpad.reliefentries=4 smdpad.polygonreliefangle="90 Angle" smdpad.airgapwidth=9.84 via.connectstyle=Direct via.reliefconductorwidth=5.12 via.reliefentries=2 via.polygonreliefangle="90 Angle" via.airgapwidth=0
PolygonConnect PolygonConnect_In_-U_VENT_L-01_P531 [IsNamedPolygon('-U_VENT_L-01_P531')] p642: thpad.connectstyle=Relief thpad.reliefconductorwidth=19.68 thpad.reliefentries=4 thpad.polygonreliefangle="90 Angle" thpad.airgapwidth=9.84 smdpad.connectstyle=Relief smdpad.reliefconductorwidth=19.68 smdpad.reliefentries=4 smdpad.polygonreliefangle="90 Angle" smdpad.airgapwidth=9.84 via.connectstyle=Direct via.reliefconductorwidth=5.12 via.reliefentries=2 via.polygonreliefangle="90 Angle" via.airgapwidth=0
PolygonConnect PolygonConnect_In_GND_L02_P471 [IsNamedPolygon('GND_L02_P471')] p643: thpad.connectstyle=Relief thpad.reliefconductorwidth=19.68 thpad.reliefentries=4 thpad.polygonreliefangle="90 Angle" thpad.airgapwidth=9.84 smdpad.connectstyle=Relief smdpad.reliefconductorwidth=19.68 smdpad.reliefentries=4 smdpad.polygonreliefangle="90 Angle" smdpad.airgapwidth=9.84 via.connectstyle=Direct via.reliefconductorwidth=5.12 via.reliefentries=2 via.polygonreliefangle="90 Angle" via.airgapwidth=0
PolygonConnect PolygonConnect_In_GND_L02_P408 [IsNamedPolygon('GND_L02_P408')] p644: thpad.connectstyle=Relief thpad.reliefconductorwidth=19.68 thpad.reliefentries=4 thpad.polygonreliefangle="90 Angle" thpad.airgapwidth=9.84 smdpad.connectstyle=Relief smdpad.reliefconductorwidth=19.68 smdpad.reliefentries=4 smdpad.polygonreliefangle="90 Angle" smdpad.airgapwidth=9.84 via.connectstyle=Direct via.reliefconductorwidth=5.12 via.reliefentries=2 via.polygonreliefangle="90 Angle" via.airgapwidth=0
PolygonConnect PolygonConnect_In_PGND_L01_P253 [IsNamedPolygon('PGND_L01_P253')] p645: thpad.connectstyle=Relief thpad.reliefconductorwidth=19.68 thpad.reliefentries=4 thpad.polygonreliefangle="90 Angle" thpad.airgapwidth=9.84 smdpad.connectstyle=Relief smdpad.reliefconductorwidth=19.68 smdpad.reliefentries=4 smdpad.polygonreliefangle="90 Angle" smdpad.airgapwidth=9.84 via.connectstyle=Direct via.reliefconductorwidth=5.12 via.reliefentries=2 via.polygonreliefangle="90 Angle" via.airgapwidth=0
PolygonConnect PolygonConnect_In_GND_L02_P405 [IsNamedPolygon('GND_L02_P405')] p646: thpad.connectstyle=Relief thpad.reliefconductorwidth=19.68 thpad.reliefentries=4 thpad.polygonreliefangle="90 Angle" thpad.airgapwidth=9.84 smdpad.connectstyle=Relief smdpad.reliefconductorwidth=19.68 smdpad.reliefentries=4 smdpad.polygonreliefangle="90 Angle" smdpad.airgapwidth=9.84 via.connectstyle=Direct via.reliefconductorwidth=5.12 via.reliefentries=2 via.polygonreliefangle="90 Angle" via.airgapwidth=0
PolygonConnect PolygonConnect_In_-U_AMP_L01_P010 [IsNamedPolygon('-U_AMP_L01_P010')] p647: thpad.connectstyle=Relief thpad.reliefconductorwidth=19.68 thpad.reliefentries=4 thpad.polygonreliefangle="90 Angle" thpad.airgapwidth=9.84 smdpad.connectstyle=Relief smdpad.reliefconductorwidth=19.68 smdpad.reliefentries=4 smdpad.polygonreliefangle="90 Angle" smdpad.airgapwidth=9.84 via.connectstyle=Direct via.reliefconductorwidth=5.12 via.reliefentries=2 via.polygonreliefangle="90 Angle" via.airgapwidth=0
PolygonConnect PolygonConnect_In_PGND_L-01_P252 [IsNamedPolygon('PGND_L-01_P252')] p648: thpad.connectstyle=Relief thpad.reliefconductorwidth=19.68 thpad.reliefentries=4 thpad.polygonreliefangle="90 Angle" thpad.airgapwidth=9.84 smdpad.connectstyle=Relief smdpad.reliefconductorwidth=19.68 smdpad.reliefentries=4 smdpad.polygonreliefangle="90 Angle" smdpad.airgapwidth=9.84 via.connectstyle=Direct via.reliefconductorwidth=5.12 via.reliefentries=2 via.polygonreliefangle="90 Angle" via.airgapwidth=0
PolygonConnect PolygonConnect_In_$6N106_L-01_P064 [IsNamedPolygon('$6N106_L-01_P064')] p649: thpad.connectstyle=Relief thpad.reliefconductorwidth=19.68 thpad.reliefentries=4 thpad.polygonreliefangle="90 Angle" thpad.airgapwidth=9.84 smdpad.connectstyle=Relief smdpad.reliefconductorwidth=19.68 smdpad.reliefentries=4 smdpad.polygonreliefangle="90 Angle" smdpad.airgapwidth=9.84 via.connectstyle=Direct via.reliefconductorwidth=5.12 via.reliefentries=2 via.polygonreliefangle="90 Angle" via.airgapwidth=0
PolygonConnect PolygonConnect_In_PGND_L02_P286 [IsNamedPolygon('PGND_L02_P286')] p650: thpad.connectstyle=Relief thpad.reliefconductorwidth=19.68 thpad.reliefentries=4 thpad.polygonreliefangle="90 Angle" thpad.airgapwidth=9.84 smdpad.connectstyle=Relief smdpad.reliefconductorwidth=19.68 smdpad.reliefentries=4 smdpad.polygonreliefangle="90 Angle" smdpad.airgapwidth=9.84 via.connectstyle=Direct via.reliefconductorwidth=5.12 via.reliefentries=2 via.polygonreliefangle="90 Angle" via.airgapwidth=0
PolygonConnect PolygonConnect_In_+U_POWER_L02_P126 [IsNamedPolygon('+U_POWER_L02_P126')] p651: thpad.connectstyle=Relief thpad.reliefconductorwidth=19.68 thpad.reliefentries=4 thpad.polygonreliefangle="90 Angle" thpad.airgapwidth=9.84 smdpad.connectstyle=Relief smdpad.reliefconductorwidth=19.68 smdpad.reliefentries=4 smdpad.polygonreliefangle="90 Angle" smdpad.airgapwidth=9.84 via.connectstyle=Direct via.reliefconductorwidth=5.12 via.reliefentries=2 via.polygonreliefangle="90 Angle" via.airgapwidth=0
PolygonConnect "PolygonConnect_InClass_\"(Inherited)\"" [InPolygonClass('"(Inherited)"')] p652: thpad.connectstyle=Relief thpad.reliefconductorwidth=19.68 thpad.reliefentries=4 thpad.polygonreliefangle="90 Angle" thpad.airgapwidth=9.84 smdpad.connectstyle=Relief smdpad.reliefconductorwidth=19.68 smdpad.reliefentries=4 smdpad.polygonreliefangle="90 Angle" smdpad.airgapwidth=9.84 via.connectstyle=Direct via.reliefconductorwidth=5.12 via.reliefentries=2 via.polygonreliefangle="90 Angle" via.airgapwidth=0
PolygonConnect [All] p653: thpad.connectstyle=Relief thpad.reliefconductorwidth=19.68 thpad.reliefentries=4 thpad.polygonreliefangle="90 Angle" thpad.airgapwidth=9.84 smdpad.connectstyle=Relief smdpad.reliefconductorwidth=19.68 smdpad.reliefentries=4 smdpad.polygonreliefangle="90 Angle" smdpad.airgapwidth=9.84 via.connectstyle=Direct via.reliefconductorwidth=5.12 via.reliefentries=2 via.polygonreliefangle="90 Angle" via.airgapwidth=0
RoutingVias [All] p1: holewidth=28 width=50 viastyle="Through Hole" minholewidth=28 minwidth=50 maxholewidth=28 maxwidth=50
SolderMaskExpansion [All] p1: expansion=4 istentingtop=FALSE
Width [All] p1: maxlimit=10 minlimit=10 preferedwidth=10
30 further rules are at their usual default settings.

## Classes and differential pairs
polygon class "\"(Inherited)\"": $2N2408_L01_P160 $2N2408_L01_P162 $2N2408_L01_P163 $2N2408_L01_P174 $2N2408_L01_P175 $2N2408_L02_P167 $2N2408_L02_P168 $2N2408_L02_P169 $2N2408_L02_P176 $2N2408_L-01_P158 $2N2408_L-01_P159 $2N2408_L-01_P161 $2N2408_L-01_P164 $2N2408_L-01_P165 $2N2408_L-01_P166 $2N2408_L-01_P170 $2N2408_L-01_P171 $2N2408_L-01_P172 $2N2408_L-01_P173 $2N2430_L01_P349 $2N2430_L02_P348 $2N2430_L-01_P347 $2N2430_L-01_P350 $2N3778_L01_P386 $2N3778_L02_P389 $2N3778_L-01_P387 $2N3778_L-01_P388 $2N3800_L01_P382 $2N3800_L02_P385 $2N3800_L-01_P383 $2N3800_L-01_P384 $2N5063_L01_P639 $2N5063_L01_P640 $2N5063_L01_P641 $2N5063_L01_P642 $4N2806_L01_P570 $4N2806_L01_P576 $4N2806_L02_P571 $4N2806_L02_P572 $4N2806_L02_P573 $4N2806_L-01_P574 $4N2806_L-01_P575 $4N2807_L01_P581 $4N2807_L02_P580 $4N2807_L-01_P577 $4N2807_L-01_P578 $4N2807_L-01_P579 $4N2811_L01_P582 $4N2811_L01_P583 $4N2811_L02_P584 $4N2811_L-01_P585 $4N2811_L-01_P586 $4N2816_L01_P498 $4N2816_L02_P500 $4N2816_L-01_P497 $4N2816_L-01_P499 $4N2819_L01_P587 $4N2819_L02_P588 $4N2819_L02_P591 $4N2819_L-01_P589 $4N2819_L-01_P590 $4N2819_L-01_P592 $4N4003_L02_P648 $4N4003_L02_P649 $4N4003_L02_P650 $4N4003_L02_P651 $4N4003_L02_P652 $4N4005_L01_P554 $4N4005_L01_P558 $4N4005_L02_P555 $4N4005_L02_P556 $4N4005_L02_P557 $4N4005_L-01_P552 $4N4005_L-01_P553 $4N4005_L-01_P559 $4N4005_L-01_P560 $4N4008_L01_P549 $4N4008_L-01_P550 $4N4008_L-01_P551 $4N4014_L01_P565 $4N4014_L01_P568 $4N4014_L02_P561 $4N4014_L02_P562 $4N4014_L02_P566 $4N4014_L-01_P563 $4N4014_L-01_P564 $4N4014_L-01_P567 $4N4014_L-01_P569 $4N4016_L01_P536 $4N4016_L01_P537 $4N4016_L01_P547 $4N4016_L02_P538 $4N4016_L02_P539 $4N4016_L02_P540 $4N4016_L-01_P541 $4N4016_L-01_P542 $4N4016_L-01_P543 $4N4016_L-01_P544 $4N4016_L-01_P545 $4N4016_L-01_P546 $4N4016_L-01_P548 $6N94_L01_P028 $6N94_L01_P029 $6N94_L01_P030 $6N94_L01_P033 $6N94_L01_P038 $6N94_L02_P031 $6N94_L02_P035 $6N94_L-01_P032 $6N94_L-01_P034 $6N94_L-01_P036 $6N94_L-01_P037 $6N101_L01_P026 $6N101_L02_P024 $6N101_L-01_P025 $6N101_L-01_P027 $6N103_L02_P647 $6N106_L01_P055 $6N106_L01_P057 $6N106_L01_P058 $6N106_L02_P053 $6N106_L02_P054 $6N106_L02_P056 $6N106_L-01_P051 $6N106_L-01_P052 $6N106_L-01_P059 $6N106_L-01_P060 $6N106_L-01_P061 $6N106_L-01_P062 $6N106_L-01_P063 $6N106_L-01_P064 $6N106_L-01_P065 $6N134_L01_P108 $6N134_L01_P109 $6N134_L02_P106 $6N134_L02_P117 $6N134_L02_P118 $6N134_L-01_P107 $6N134_L-01_P110 $6N134_L-01_P111 $6N134_L-01_P112 $6N134_L-01_P113 $6N134_L-01_P114 $6N134_L-01_P115 $6N134_L-01_P116 $6N135_L01_P086 $6N135_L01_P089 $6N135_L01_P095 $6N135_L01_P096 $6N135_L01_P097 $6N135_L01_P100 $6N135_L01_P101 $6N135_L01_P103 $6N135_L02_P087 $6N135_L02_P090 $6N135_L02_P092 $6N135_L02_P098 $6N135_L02_P099 $6N135_L-01_P084 $6N135_L-01_P085 $6N135_L-01_P088 $6N135_L-01_P091 $6N135_L-01_P093 $6N135_L-01_P094 $6N135_L-01_P102 $6N135_L-01_P104 $6N135_L-01_P105 $6N737_L01_P018 $6N737_L01_P023 $6N737_L02_P013 $6N737_L02_P014 $6N737_L02_P015 $6N737_L02_P016 $6N737_L02_P020 $6N737_L-01_P017 $6N737_L-01_P019 $6N737_L-01_P021 $6N737_L-01_P022 $6N3156_L01_P066 $6N3156_L01_P077 $6N3156_L01_P078 $6N3156_L02_P069 $6N3156_L02_P070 $6N3156_L02_P071 $6N3156_L02_P081 $6N3156_L02_P083 $6N3156_L-01_P067 $6N3156_L-01_P068 $6N3156_L-01_P072 $6N3156_L-01_P073 $6N3156_L-01_P074 $6N3156_L-01_P075 $6N3156_L-01_P076 $6N3156_L-01_P079 $6N3156_L-01_P080 $6N3156_L-01_P082 $6N3315_L01_P047 $6N3315_L02_P049 $6N3315_L02_P050 $6N3315_L-01_P046 $6N3315_L-01_P048 +15V_L01_P480 +15V_L01_P484 +15V_L02_P478 +15V_L02_P482 +15V_L-01_P475 +15V_L-01_P476 +15V_L-01_P477 +15V_L-01_P479 +15V_L-01_P481 +15V_L-01_P483 +15V_L-01_P485 +15V_L-01_P486 +U_AMP_L01_P039 +U_AMP_L01_P043 +U_AMP_L02_P041 +U_AMP_L-01_P040 +U_AMP_L-01_P042 +U_AMP_L-01_P044 +U_AMP_L-01_P045 +U_POWER_L01_P125 +U_POWER_L02_P120 +U_POWER_L02_P121 +U_POWER_L02_P122 +U_POWER_L02_P126 +U_POWER_L02_P127 +U_POWER_L02_P128 +U_POWER_L-01_P119 +U_POWER_L-01_P123 +U_POWER_L-01_P124 +U_UM_L01_P489 +U_UM_L02_P490 +U_UM_L-01_P487 +U_UM_L-01_P488 +U_UM_L-01_P491 +U_VENT_L01_P509 +U_VENT_L01_P510 +U_VENT_L02_P501 +U_VENT_L02_P502 +U_VENT_L02_P503 +U_VENT_L02_P504 +U_VENT_L02_P505 +U_VENT_L02_P506 +U_VENT_L02_P507 +U_VENT_L02_P508 +U_VENT_L02_P512 +U_VENT_L02_P513 +U_VENT_L02_P516 +U_VENT_L02_P517 +U_VENT_L02_P518 +U_VENT_L-01_P511 +U_VENT_L-01_P514 +U_VENT_L-01_P515 -U_AMP_L01_P005 -U_AMP_L01_P007 -U_AMP_L01_P008 -U_AMP_L01_P009 -U_AMP_L01_P010 -U_AMP_L02_P002 -U_AMP_L02_P003 -U_AMP_L-01_P004 -U_AMP_L-01_P006 -U_AMP_L-01_P011 -U_AMP_L-01_P012 -U_UM_L01_P493 -U_UM_L02_P494 -U_UM_L02_P496 -U_UM_L-01_P492 -U_UM_L-01_P495 -U_VENT_L01_P519 -U_VENT_L01_P520 -U_VENT_L01_P526 -U_VENT_L02_P528 -U_VENT_L02_P529 -U_VENT_L02_P530 -U_VENT_L02_P533 -U_VENT_L02_P534 -U_VENT_L02_P535 -U_VENT_L-01_P521 -U_VENT_L-01_P522 -U_VENT_L-01_P523 -U_VENT_L-01_P524 -U_VENT_L-01_P525 -U_VENT_L-01_P527 -U_VENT_L-01_P531 -U_VENT_L-01_P532 GND_L01_P395 GND_L01_P416 GND_L01_P417 GND_L01_P418 GND_L01_P419 GND_L01_P420 GND_L01_P421 GND_L01_P422 GND_L01_P423 GND_L01_P424 GND_L01_P425 GND_L01_P426 GND_L01_P427 GND_L01_P428 GND_L01_P429 GND_L01_P430 GND_L01_P431 GND_L01_P432 GND_L01_P433 GND_L01_P434 GND_L01_P435 GND_L01_P436 GND_L01_P437 GND_L01_P438 GND_L01_P439 GND_L01_P440 GND_L01_P441 GND_L01_P442 GND_L01_P443 GND_L01_P444 GND_L01_P445 GND_L01_P446 GND_L01_P447 GND_L01_P448 GND_L01_P449 GND_L01_P450 GND_L01_P451 GND_L01_P452 GND_L01_P453 GND_L01_P454 GND_L01_P455 GND_L01_P456 GND_L01_P457 GND_L01_P458 GND_L01_P459 GND_L01_P460 GND_L01_P461 GND_L01_P462 GND_L01_P463 GND_L01_P464 GND_L01_P465 GND_L01_P468 GND_L01_P469 GND_L02_P390 GND_L02_P391 GND_L02_P392 GND_L02_P393 GND_L02_P394 GND_L02_P396 GND_L02_P397 GND_L02_P398 GND_L02_P399 GND_L02_P400 GND_L02_P401 GND_L02_P402 GND_L02_P403 GND_L02_P404 GND_L02_P405 GND_L02_P406 GND_L02_P407 GND_L02_P408 GND_L02_P409 GND_L02_P410 GND_L02_P411 GND_L02_P412 GND_L02_P413 GND_L02_P414 GND_L02_P415 GND_L02_P470 GND_L02_P471 GND_L-01_P466 GND_L-01_P467 GND_L-01_P472 GND_L-01_P473 GND_L-01_P474 GND_UM_L01_P593 GND_UM_L01_P594 GND_UM_L01_P598 GND_UM_L01_P599 GND_UM_L01_P600 GND_UM_L01_P601 GND_UM_L01_P602 GND_UM_L01_P603 GND_UM_L01_P604 GND_UM_L01_P605 GND_UM_L01_P606 GND_UM_L01_P607 GND_UM_L01_P608 GND_UM_L01_P609 GND_UM_L01_P610 GND_UM_L01_P611 GND_UM_L01_P628 GND_UM_L01_P631 GND_UM_L01_P632 GND_UM_L02_P595 GND_UM_L02_P596 GND_UM_L02_P597 GND_UM_L02_P613 GND_UM_L02_P614 GND_UM_L02_P615 GND_UM_L02_P616 GND_UM_L02_P617 GND_UM_L02_P618 GND_UM_L02_P619 GND_UM_L02_P620 GND_UM_L02_P621 GND_UM_L02_P622 GND_UM_L02_P623 GND_UM_L02_P624 GND_UM_L02_P625 GND_UM_L02_P626 GND_UM_L02_P627 GND_UM_L02_P629 GND_UM_L02_P630 GND_UM_L02_P633 GND_UM_L-01_P612 GND_UM_L-01_P634 GND_UM_L-01_P635 GND_UM_L-01_P636 GND_UM_L-01_P637 GND_UM_L-01_P638 I_AMP_L02_P645 I_AMP_L02_P646 I_AMP_L-01_P643 I_AMP_L-01_P644 I_MOST_L01_P335 I_MOST_L01_P336 I_MOST_L02_P331 I_MOST_L02_P333 I_MOST_L-01_P332 I_MOST_L-01_P334 I_MOST_L-01_P337 I_MOST_L-01_P338 PGND_L01_P181 PGND_L01_P189 PGND_L01_P191 PGND_L01_P192 PGND_L01_P193 PGND_L01_P194 PGND_L01_P195 PGND_L01_P196 PGND_L01_P199 PGND_L01_P200 PGND_L01_P201 PGND_L01_P205 PGND_L01_P206 PGND_L01_P210 PGND_L01_P211 PGND_L01_P212 PGND_L01_P213 PGND_L01_P214 PGND_L01_P216 PGND_L01_P218 PGND_L01_P219 PGND_L01_P220 PGND_L01_P221 PGND_L01_P222 PGND_L01_P223 PGND_L01_P224 PGND_L01_P225 PGND_L01_P226 PGND_L01_P227 PGND_L01_P228 PGND_L01_P234 PGND_L01_P236 PGND_L01_P240 PGND_L01_P241 PGND_L01_P243 PGND_L01_P253 PGND_L01_P254 PGND_L01_P260 PGND_L01_P261 PGND_L01_P264 PGND_L01_P265 PGND_L01_P266 PGND_L01_P267 PGND_L01_P268 PGND_L01_P269 PGND_L01_P270 PGND_L01_P271 PGND_L01_P272 PGND_L01_P273 PGND_L01_P274 PGND_L01_P275 PGND_L01_P276 PGND_L01_P278 PGND_L01_P284 PGND_L01_P289 PGND_L01_P290 PGND_L01_P295 PGND_L01_P303 PGND_L02_P177 PGND_L02_P202 PGND_L02_P208 PGND_L02_P209 PGND_L02_P229 PGND_L02_P230 PGND_L02_P231 PGND_L02_P238 PGND_L02_P244 PGND_L02_P245 PGND_L02_P246 PGND_L02_P257 PGND_L02_P285 PGND_L02_P286 PGND_L02_P297 PGND_L02_P298 PGND_L02_P299 PGND_L02_P304 PGND_L02_P307 PGND_L02_P309 PGND_L02_P310 PGND_L02_P311 PGND_L02_P312 PGND_L-01_P178 PGND_L-01_P179 PGND_L-01_P180 PGND_L-01_P182 PGND_L-01_P183 PGND_L-01_P184 PGND_L-01_P185 PGND_L-01_P186 PGND_L-01_P187 PGND_L-01_P188 PGND_L-01_P190 PGND_L-01_P197 PGND_L-01_P198 PGND_L-01_P203 PGND_L-01_P204 PGND_L-01_P207 PGND_L-01_P215 PGND_L-01_P217 PGND_L-01_P232 PGND_L-01_P233 PGND_L-01_P235 PGND_L-01_P237 PGND_L-01_P239 PGND_L-01_P242 PGND_L-01_P247 PGND_L-01_P248 PGND_L-01_P249 PGND_L-01_P250 PGND_L-01_P251 PGND_L-01_P252 PGND_L-01_P255 PGND_L-01_P256 PGND_L-01_P258 PGND_L-01_P259 PGND_L-01_P262 PGND_L-01_P263 PGND_L-01_P277 PGND_L-01_P279 PGND_L-01_P280 PGND_L-01_P281 PGND_L-01_P282 PGND_L-01_P283 PGND_L-01_P287 PGND_L-01_P288 PGND_L-01_P291 PGND_L-01_P292 PGND_L-01_P293 PGND_L-01_P294 PGND_L-01_P296 PGND_L-01_P300 PGND_L-01_P301 PGND_L-01_P302 PGND_L-01_P305 PGND_L-01_P306 PGND_L-01_P308 PGND_L-01_P313 PGND_L-01_P314 PGND_L-01_P315 U_FIN_L01_P140 U_FIN_L01_P141 U_FIN_L01_P142 U_FIN_L02_P137 U_FIN_L02_P147 U_FIN_L02_P148 U_FIN_L-01_P138 U_FIN_L-01_P139 U_FIN_L-01_P143 U_FIN_L-01_P144 U_FIN_L-01_P145 U_FIN_L-01_P146 U_MOST_L01_P342 U_MOST_L01_P343 U_MOST_L02_P341 U_MOST_L02_P346 U_MOST_L-01_P339 U_MOST_L-01_P340 U_MOST_L-01_P344 U_MOST_L-01_P345 U_TP_L01_P351 U_TP_L02_P354 U_TP_L-01_P352 U_TP_L-01_P353 U_TS_L01_P149 U_TS_L01_P153 U_TS_L01_P154 U_TS_L02_P150 U_TS_L02_P157 U_TS_L-01_P151 U_TS_L-01_P152 U_TS_L-01_P155 U_TS_L-01_P156 UH_L01_P316 UH_L01_P318 UH_L01_P320 UH_L01_P325 UH_L02_P317 UH_L02_P326 UH_L-01_P319 UH_L-01_P321 UH_L-01_P322 UH_L-01_P323 UH_L-01_P324 UH_L-01_P327 UH_L-01_P328 UH_L-01_P329 UH_L-01_P330 UL_L01_P361 UL_L01_P362 UL_L01_P370 UL_L01_P371 UL_L01_P372 UL_L01_P374 UL_L01_P378 UL_L02_P359 UL_L02_P366 UL_L02_P373 UL_L02_P376 UL_L02_P377 UL_L-01_P360 UL_L-01_P363 UL_L-01_P364 UL_L-01_P365 UL_L-01_P367 UL_L-01_P368 UL_L-01_P369 UL_L-01_P375 UL_L-01_P379 UL_L-01_P380 UL_L-01_P381 ~U_FIN_L01_P129 ~U_FIN_L02_P132 ~U_FIN_L-01_P130 ~U_FIN_L-01_P131 ~U_TP_L01_P356 ~U_TP_L02_P358 ~U_TP_L-01_P355 ~U_TP_L-01_P357 ~U_TS_L01_P133 ~U_TS_L02_P136 ~U_TS_L-01_P134 ~U_TS_L-01_P135

## Components (designator, comment, footprint, x,y, rotation, side; value= is the part's Value field where it differs from the comment)
C1 "C3225X7T2J104K160AC" 1210-STANDART-3225 2454.72,6336.61 r0 bottom
C2 "C3225X7T2J104K160AC" 1210-STANDART-3225 3931.1,6277.56 r0 bottom
C3 "C3225X7T2J104K160AC" 1210-STANDART-3225 1647.64,2704.72 r90 bottom
C4 "C3225X7T2J104K160AC" 1210-STANDART-3225 5673.23,3974.41 r180 bottom
C5 "C3225X7T2J104K160AC" 1210-STANDART-3225 5653.54,3098.43 r180 bottom
C6 "C3225X7T2J104K160AC" 1210-STANDART-3225 4944.88,4397.64 r270 bottom
C7 "C3225X7T2J104K160AC" 1210-STANDART-3225 4994.09,4653.54 r180 bottom
C8 "C3225X7T2J104K160AC" 1210-STANDART-3225 2001.97,3688.98 r90 bottom
C9 "C3225X7T2J104K160AC" 1210-STANDART-3225 2001.97,4269.69 r90 bottom
C10 "R46KI21004001K1" CAP_PP_L15mm_UNIVER_V1 2759.84,2616.14 r180 top locked
C11 "R46KI21004001K1" CAP_PP_L15mm_UNIVER_V1 5811.02,4761.81 r180 top locked
C12 "R46KI21004001K1" CAP_PP_L15mm_UNIVER_V1 5003.94,4761.81 r180 top locked
C13 "CL10B104KB8SFNC" 0603-STANDART-1608 6204.72,9988.19 r180 bottom
C14 "CL10B104KB8SFNC" 0603-STANDART-1608 6096.46,10381.89 r180 top
C15 "CL10B104KB8SFNC" 0603-STANDART-1608 5043.31,11543.31 r90 top
C16 "CL10B104KB8SFNC" 0603-STANDART-1608 4866.14,11218.5 r90 bottom
C17 "CL10B104KB8SFNC" 0603-STANDART-1608 1775.59,7625.98 r270 bottom
C18 "CL10B104KB8SFNC" 0603-STANDART-1608 1460.63,8462.6 r270 top
C19 "CL10B104KB8SFNC" 0603-STANDART-1608 3586.61,7094.49 r270 bottom
C20 "CL10B104KB8SFNC" 0603-STANDART-1608 2120.08,7094.49 r270 bottom
C21 "CL10B104KB8SFNC" 0603-STANDART-1608 1923.23,7409.45 r180 top
C22 "CL10B104KB8SFNC" 0603-STANDART-1608 3320.87,7448.82 r180 bottom
C23 "CL10B104KB8SFNC" 0603-STANDART-1608 1775.59,8659.45 r180 bottom
C24 "CL10B104KB8SFNC" 0603-STANDART-1608 1037.4,9722.44 r0 bottom
C25 "CL10B104KB8SFNC" 0603-STANDART-1608 1559.06,9663.39 r180 bottom
C26 "CL10B104KB8SFNC" 0603-STANDART-1608 1401.57,9348.43 r90 top
C27 "CL10B104KB8SFNC" 0603-STANDART-1608 1322.83,8816.93 r180 bottom
C28 "CL10B104KB8SFNC" 0603-STANDART-1608 5437.01,5549.21 r180 bottom
C29 "CL10B104KB8SFNC" 0603-STANDART-1608 5633.86,5657.48 r180 top
C30 "CL10B104KB8SFNC" 0603-STANDART-1608 5131.89,5706.69 r0 top
C31 "CL10B104KB8SFNC" 0603-STANDART-1608 4935.04,6061.02 r90 bottom
C32 "CL10B104KB8SFNC" 0603-STANDART-1608 5496.06,5135.83 r180 bottom
C33 "CL10B104KB8SFNC" 0603-STANDART-1608 1559.06,9545.28 r180 bottom
C34 "CL10B104KB8SFNC" 0603-STANDART-1608 5131.89,5529.53 r0 top